# Altium PCB ePBR25_ACU_Latching_rev0.PcbDoc (part 2 of 3)
Units mil, origin at the board's own origin, x right, y up, seen from the top; angles counter-clockwise.
Board outline 2203 x 2390 mil, 2 copper layers (Top Layer, Bottom Layer); 131 components, 88 nets, 367 pads, 243 vias.
Unrouted connection lines stored in the file: 94.
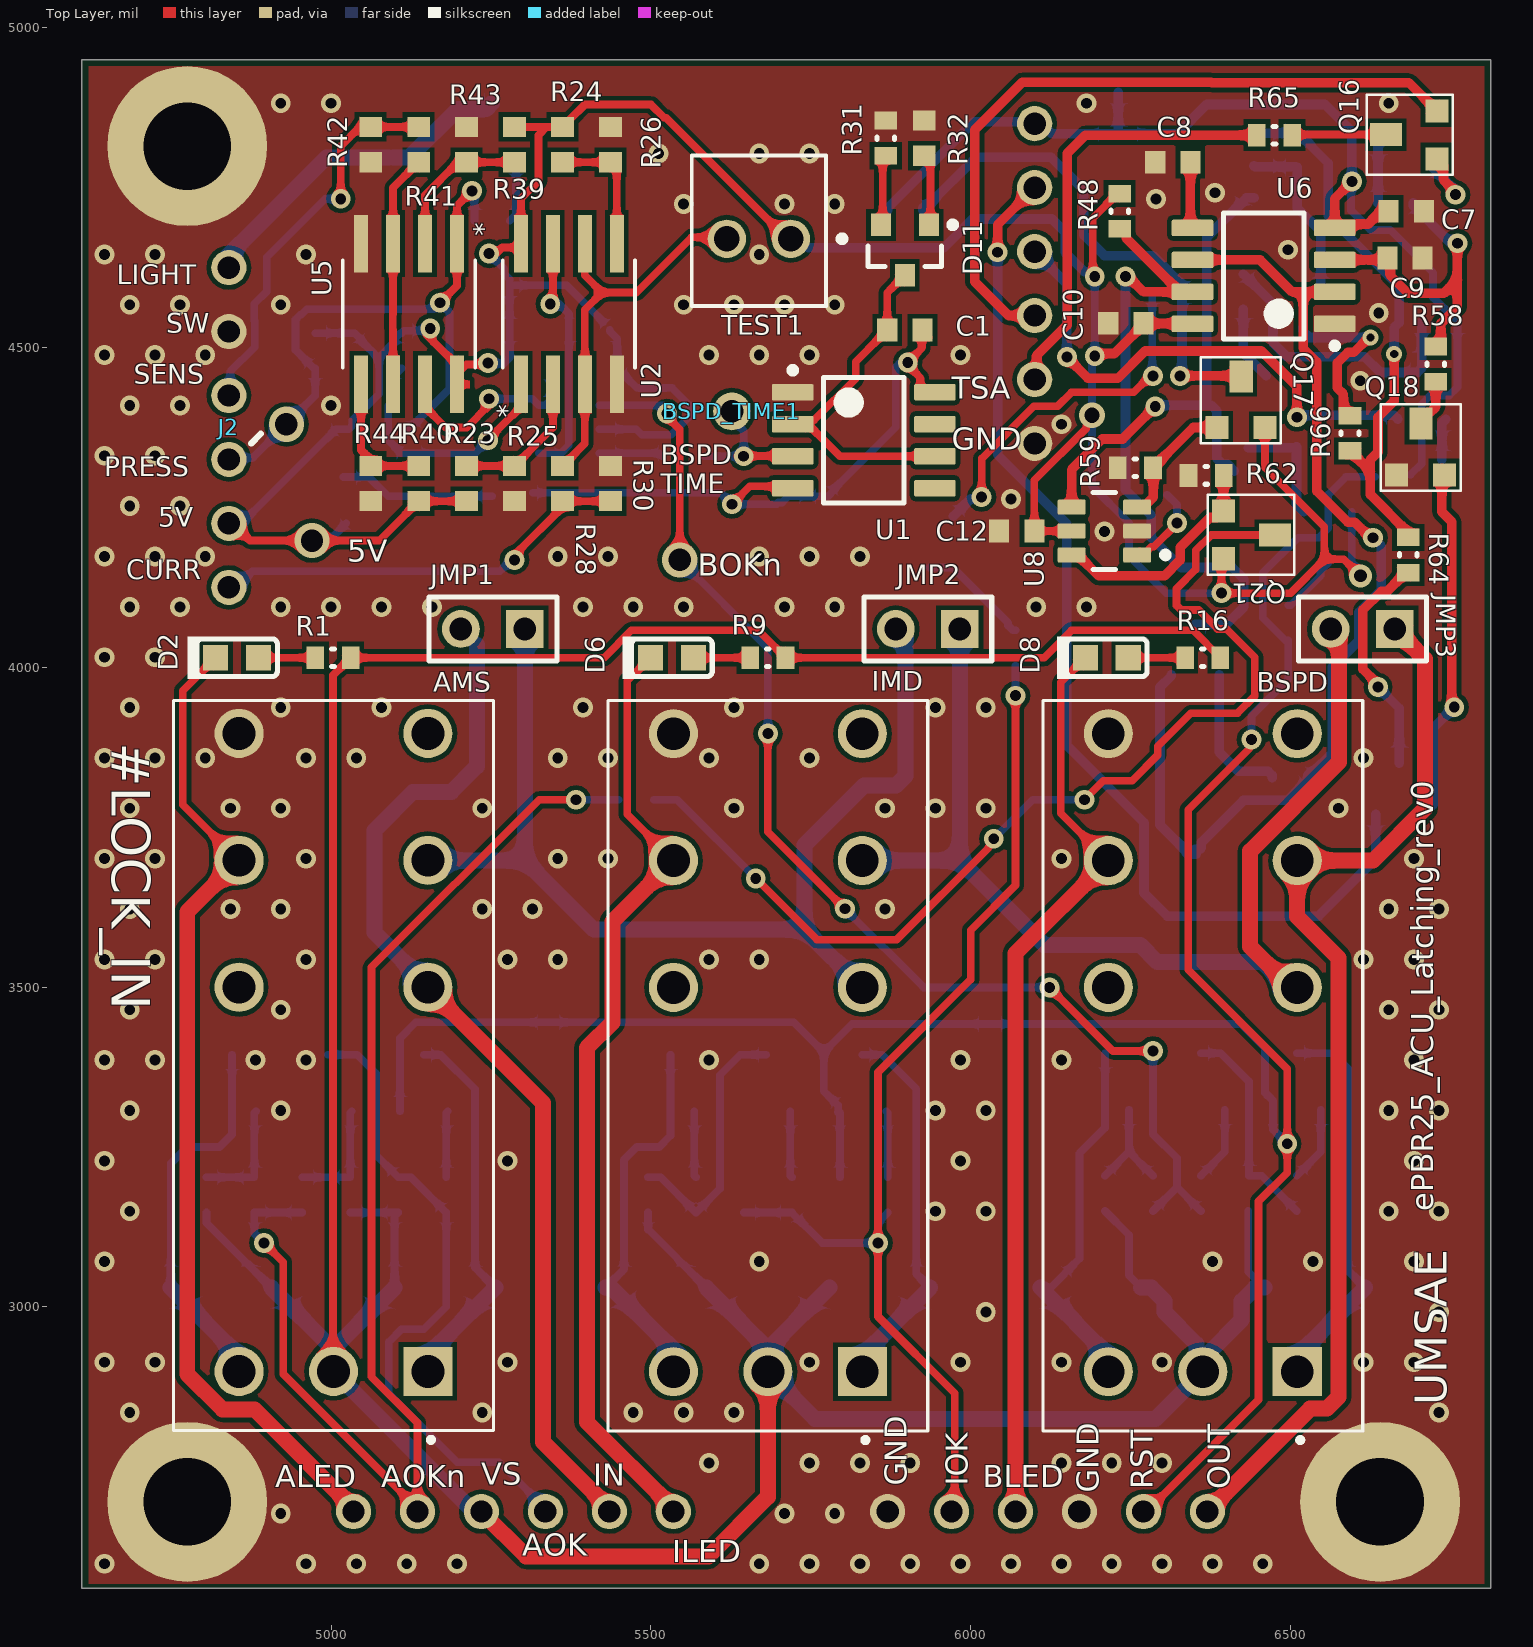
[diagram p0: Top Layer view]

## Via types
v1: diameter 31, hole 17, Top Layer to Bottom Layer, 236 vias
v2: diameter 55, hole 35, Top Layer to Bottom Layer, 3 vias
v3: diameter 25, hole 13, Top Layer to Bottom Layer, 2 vias
v4: diameter 40, hole 24, Top Layer to Bottom Layer, 1 vias
v5: diameter 36, hole 20, Top Layer to Bottom Layer, 1 vias

## Nets (pads, with @x,y where several pads share a name; then routed paths per layer and width w, separated by ;. In a path a pad name is that pad's centre, name@x,y a point inside that pad or via, vN(x,y) a via of type N, cw(c..) or ccw(c..) an arc to the next point about the centre after c; other vN are vias at no path point) (continued)
2IN+_CURR: (continued)
  Top Layer w12: R24.1@5361.75,4789.76 R26.2@5436.75,4789.76 5446.75,4779.76 U2.5@5446.75,4662.32
5V: C3.1 C4.1 C5.1 C6.1 C10.2 C12.1 D1.2 J2.A2 Q13.3 Q17.3 Q21.3 R23.2 R24.2 R33.2 R34.2 R39.2 R40.2 R46.2 R47.2 R48.1 TEST1.1 U2.8 U3.5 U4.5 U5.8 U6.8 U8.5 | length 5248.9
  Top Layer w12: J2.A2@4840,4225 4846.27,4225 4873.14,4198.14 v2(4970,4198.14) 5075.12,4198.14 R40.2@5136.75,4259.76 R23.2@5211.75,4259.76 ; v1(5155,4530) 5155,4525.93 5149.07,4520 5196.75,4472.32 U5.8@5196.75,4458.73 ; U5.8@5196.75,4442.32 U5.8@5196.75,4458.73 ; v1(5245,4476) 5242.48,4473.48 5211.5,4473.48 U5.8@5196.75,4458.73 ; v1(5247,4647) 5249.2,4644.8 5255.78,4644.8 5267.37,4656.39 5291.75,4656.39 5296.75,4661.39 U2.8@5296.75,4662.32 5296.75,4732.32 5324.25,4759.82 5324.25,4832 5337.13,4844.88 ; R39.2@5286.75,4844.88 5337.13,4844.88 ; TEST1.1@5715.92,4667.12 5523.56,4859.48 5520.52,4859.48 5500,4880 5396.86,4880 5373.46,4856.6 5373.46,4854.63 5363.71,4844.88 5337.13,4844.88 ; C12.1@6099.56,4209.62 C12.1@6099.56,4213.06 ; U8.5@6157.71,4213.06 6123.06,4213.06 C12.1@6099.56,4213.06 ; v4(6189.67,4394.06) 6189.67,4386.48 6180.63,4377.45 6180.63,4373.36 6099.56,4292.28 C12.1@6099.56,4213.06 ; v1(6194,4487) v1@6197.64,4490.64 ; v1(6194,4611) 6190.6,4614.4 6190.6,4702.3 6228.86,4740.56 R48.1@6232.79,4740.56 ; C10.2@6270.12,4536.03 C10.2@6270.12,4538 C10.2@6270.62,4537.5 ; U6.8@6346.28,4537.5 U6.8@6346.78,4537 ; Q21.3@6395.47,4169.75 6392,4166.27 v1(6392,4116) 6500,4116 6553,4169 ; Q17.3@6460,4375 6460,4312.5 6553,4219.5 6553,4169 ; v5(6609.34,4143) 6583.34,4169 6553,4169
  Top Layer w15: v1@6197.64,4490.64 6224.72,4490.64 C10.2@6270.12,4536.03 ; C10.2@6270.62,4537.5 U6.8@6346.28,4537.5
  Bottom Layer w12: J2.A2@4840,4225 4844.14,4229.14 4864.14,4229.14 5007.32,4372.32 U4.5@5019.38,4372.32 5027.26,4372.32 5033.07,4378.13 5033.07,4386.01 5075,4427.94 5075,4482.56 ; v2(4970,4198.14) 4975.89,4204.03 5002.65,4204.03 D1.2@5023.62,4225 ; R46.2@4975,4522.56 C4.1@5035,4522.56 5036.97,4522.56 5046.72,4512.81 5046.72,4510.84 5075,4482.56 ; v1@5155,4520 v1(5155,4530) 5151.36,4526.36 5113.81,4526.36 R33.2@5110,4522.56 5108.03,4522.56 5098.28,4512.81 5098.28,4507.57 5079.28,4488.57 5079.28,4486.84 5075,4482.56 ; v1(5245,4476) 5245.96,4475.04 5270.07,4475.04 5279.3,4484.28 C6.1@5279.3,4527.32 C3.1@5279.3,4597.32 ; v1(5247,4647) 5270.69,4623.31 5270.69,4615.62 5279.3,4607 C3.1@5279.3,4597.32 ; U3.5@5418.99,4372.32 5476.92,4372.32 5485.75,4363.5 5531.87,4363.5 5560,4391.63 5560,4410 5532.87,4437.13 5524.1,4437.13 5523.69,4436.72 5481.43,4436.72 5481.02,4437.13 5477.75,4437.13 5459.16,4455.72 5457.19,4455.72 5447.44,4465.47 C5.1@5447.44,4467.44 5447.44,4513.46 5435.54,4525.35 R34.2@5435.54,4527.32 ; R34.2@5425.31,4540 5367.98,4597.32 C3.1@5279.3,4597.32 ; TEST1.1@5718.8,4670 5731.78,4670 5745.78,4656 ; v1(6194,4611) 6194,4481.86 6189.67,4477.53 v4(6189.67,4394.06) 6189.67,4283.43 6247.4,4225.7 6247.4,4174.18 6305.58,4116 v1(6392,4116) ; Q13.3@6596,4243 6596,4163.92 6609.34,4150.58 v5(6609.34,4143)
  Bottom Layer w15: 5745.78,4656 5958,4656 6003,4701 6127,4701 6147.58,4680.42 6147.58,4648.69 6177.77,4618.51 6182.16,4618.51 6189.67,4611 v1(6194,4611)
A\M\S\_\O\K\: J4.A2 R5.1 R8.1 R68.1 | length 2022.3
  Top Layer w12: v1(4895,3100) 4925,3070 4925,2895 J4.A2@5135,2685 ; J4.A2@5135,2680 J4.A2@5135,2685 ; J4.A2@5137.5,2682.5 J4.A2@5135,2685 ; v1(5383,3793) 5325.19,3793 5063,3530.81 5063,2891 5135,2819 J4.A2@5135,2685
  Bottom Layer w12: v1(4895,3100) 4880,3115 R8.1@4880,3147.44 R5.1@4955,3147.44 ; v1(5383,3793) R68.1@5449.44,3793